# Altium PCB 0060631C.PcbDoc (part 6 of 7)
Units mil, origin at the board's own origin, x right, y up, seen from the top; angles counter-clockwise.
Board outline 5480 x 8249 mil, 6 copper layers (Top Layer, Mid-Layer 1, Mid-Layer 2, Internal Plane 1, Internal Plane 2, Bottom Layer); 514 components, 269 nets, 1375 pads, 1334 vias.
Unrouted connection lines stored in the file: 126.
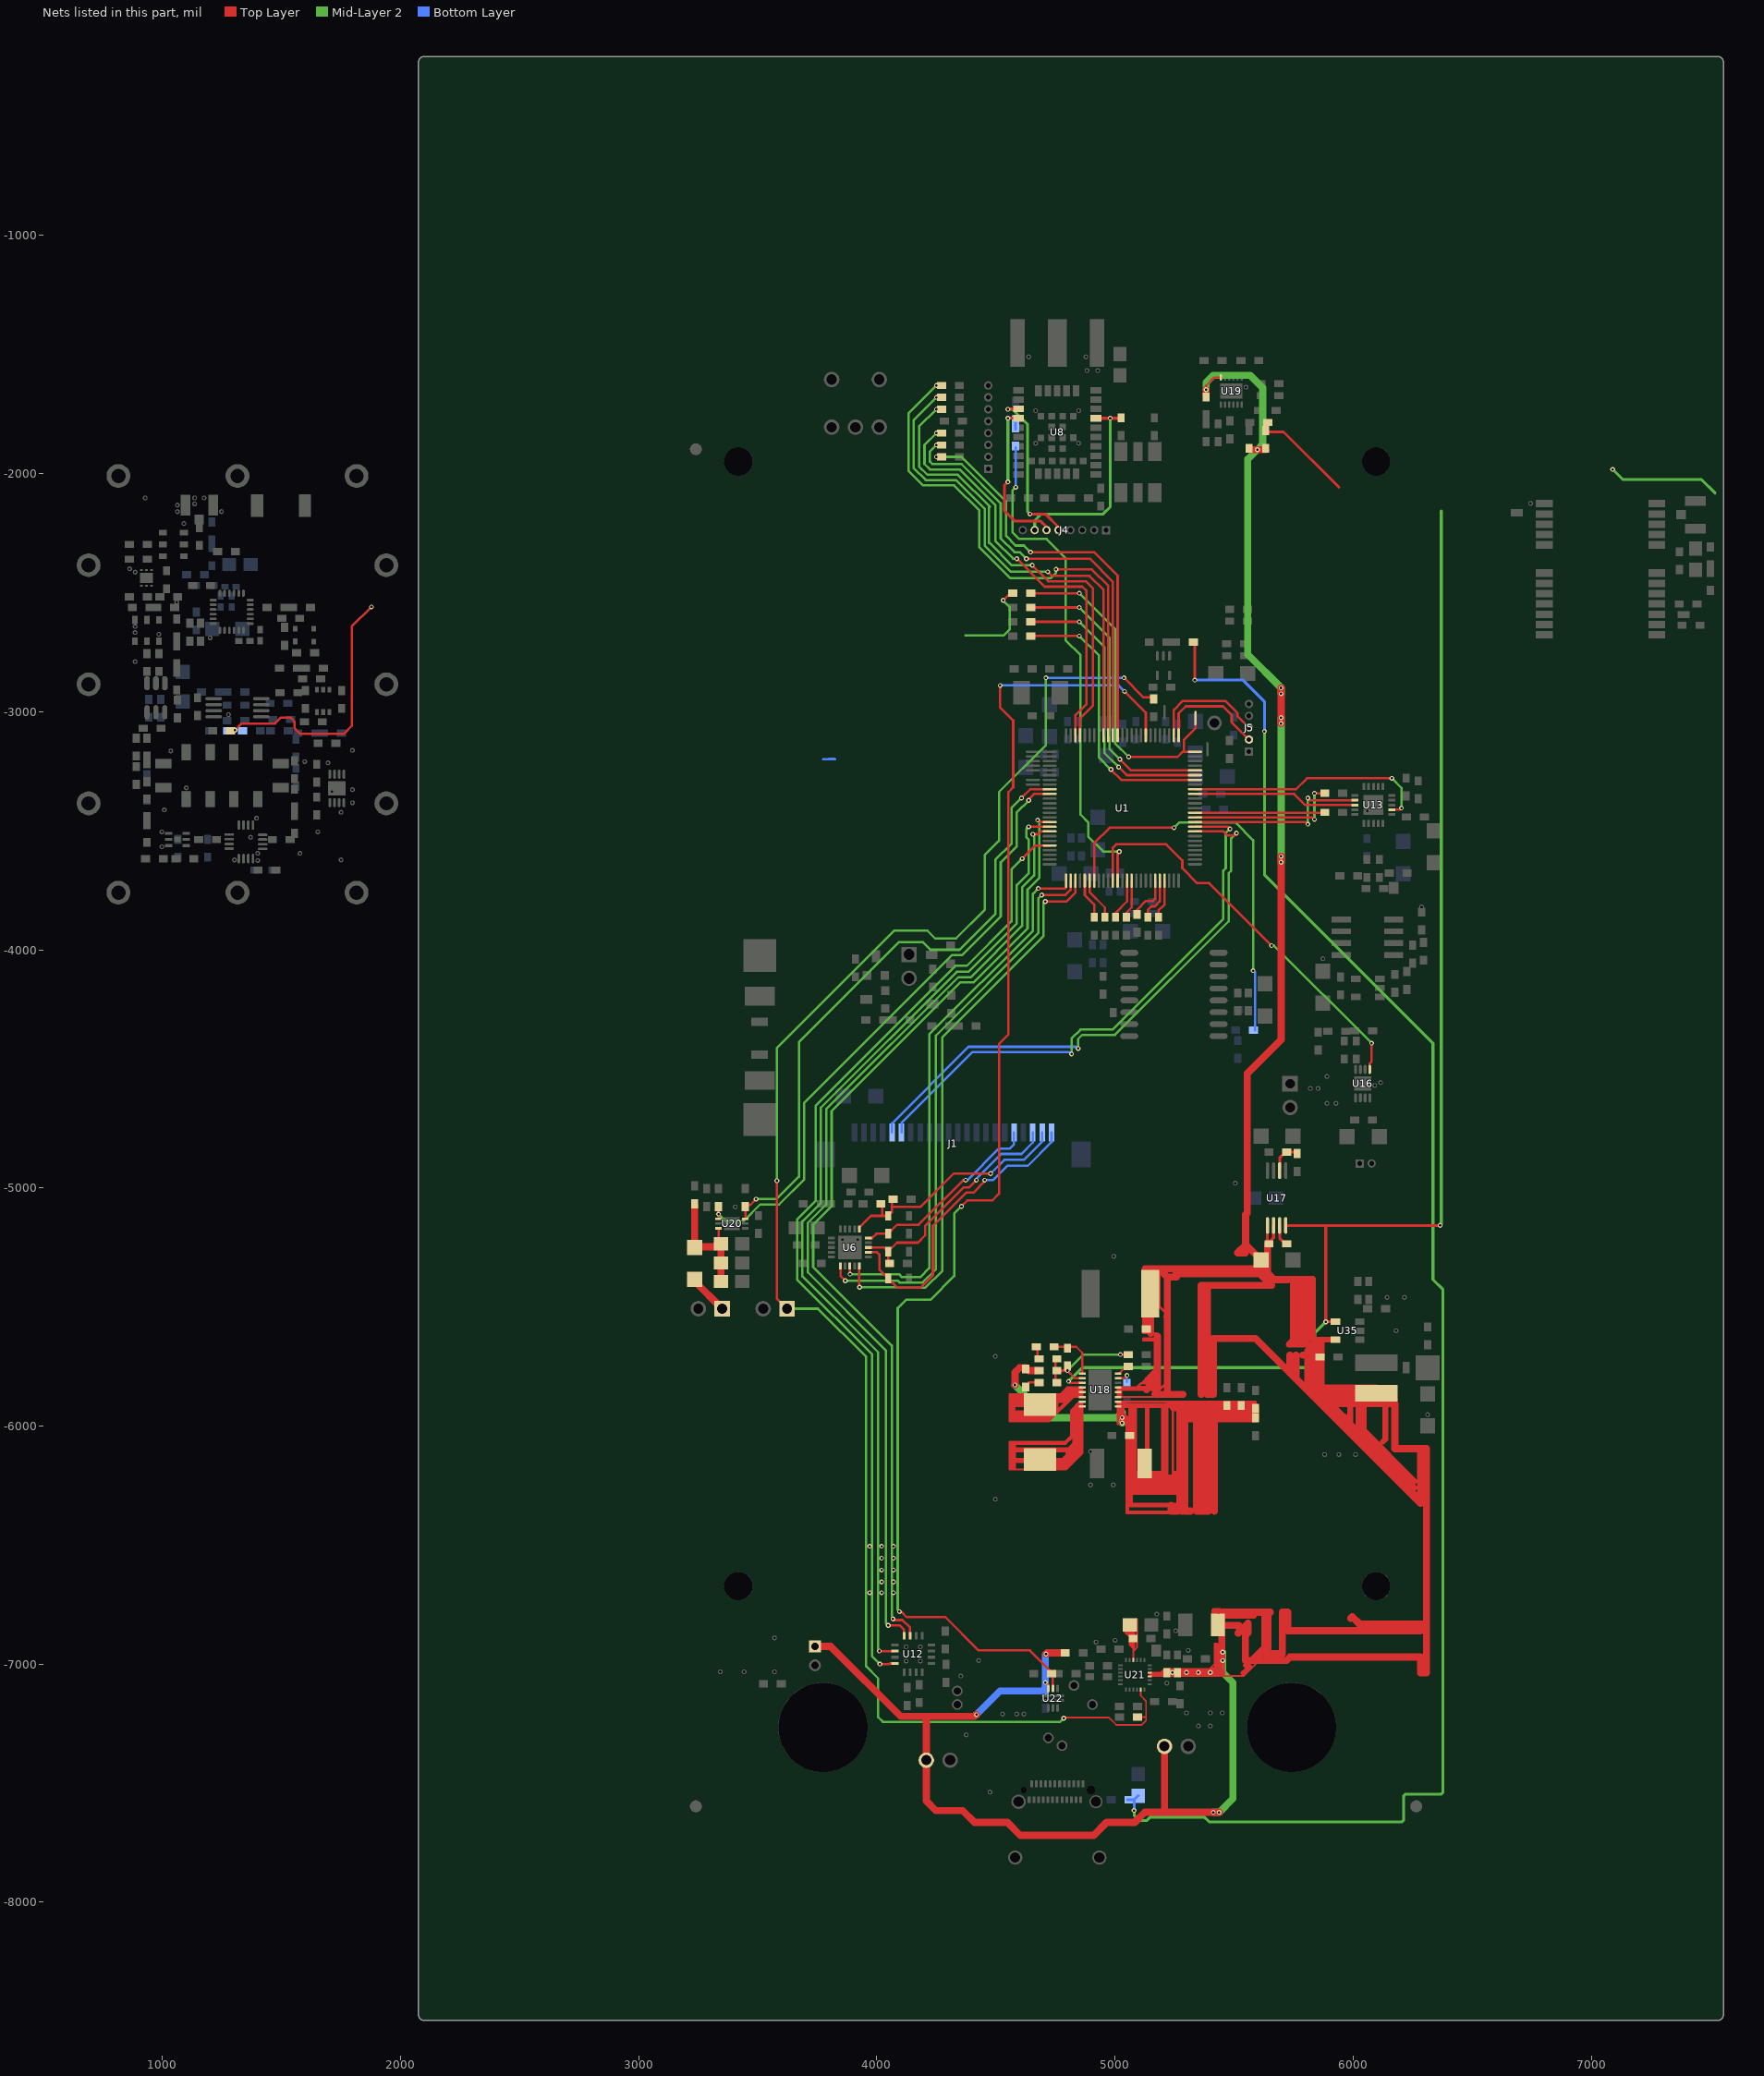
[diagram p10: the nets of this part, all layers, seen from the top]

## Via types
v1: diameter 20, hole 10, Top Layer to Bottom Layer, 1334 vias

## Nets (pads, with @x,y where several pads share a name; then routed paths per layer and width w, separated by ;. In a path a pad name is that pad's centre, name@x,y a point inside that pad or via, vN(x,y) a via of type N, cw(c..) or ccw(c..) an arc to the next point about the centre after c; other vN are vias at no path point) (continued)
N00220: L2.1 U18.12 U18.13 U18.14 | length 2929.3
  Top Layer w9: L2.1@4684.9,-5910 L2.1@4682.4,-5907.5 ; U18.13@4857.4,-5860.8 4857.4,-5852.5 ; 4562.4,-5980 4562.4,-5972.5 ; 4562.4,-5980 4722.4,-5980 4824.9,-5877.5 4862.4,-5877.5 U18.14@4862.4,-5878.1 4862.4,-5870 ; 4562.4,-5980 4557.4,-5980 4557.4,-5867.5 4562.4,-5867.5 ; 4562.4,-5972.5 4562.4,-5882.5 ; 4562.4,-5972.5 4714.9,-5972.5 4719.9,-5972.5 4822.4,-5870 4862.4,-5870 ; 4562.4,-5882.5 4562.4,-5875 ; 4562.4,-5882.5 L2.1@4682.4,-5882.5 ; 4562.4,-5875 4562.4,-5867.5 ; 4562.4,-5875 L2.1@4682.4,-5875 ; 4562.4,-5867.5 L2.1@4682.4,-5867.5 ; L2.1@4682.4,-5907.5 L2.1@4682.4,-5892.5 ; L2.1@4682.4,-5907.5 L2.1@4682.4,-5892.5 ; L2.1@4682.4,-5892.5 L2.1@4682.4,-5882.5 ; L2.1@4682.4,-5882.5 4774.9,-5882.5 4804.9,-5852.5 4857.4,-5852.5 ; L2.1@4682.4,-5882.5 L2.1@4682.4,-5875 ; L2.1@4682.4,-5875 4772.4,-5875 4802.4,-5845 4857.4,-5845 ; L2.1@4682.4,-5875 L2.1@4682.4,-5867.5 ; L2.1@4682.4,-5867.5 4769.9,-5867.5 4798.6,-5838.8 U18.12@4862.4,-5838.8 4862.4,-5845 ; 4857.4,-5852.5 4857.4,-5845 ; 4857.4,-5852.5 4862.4,-5852.5 ; 4857.4,-5845 4862.4,-5845 ; 4862.4,-5870 U18.13@4862.4,-5858.4 4862.4,-5852.5 ; 4862.4,-5852.5 4862.4,-5845
  Top Layer w20: 4572.4,-5927.5 4572.4,-5910 ; 4714.9,-5972.5 4757.4,-5930 4752.4,-5925 ; U18.13@4857.4,-5860.8 4814.1,-5860.8 4782.4,-5892.5 4752.4,-5892.5 ; 4572.4,-5910 4572.4,-5892.5 L2.1@4682.4,-5892.5 ; 4572.4,-5910 L2.1@4684.9,-5910 4649.9,-5945 4572.4,-5945 4572.4,-5962.5 4707.4,-5962.5 4748.6,-5921.3 4752.4,-5925 ; L2.1@4682.4,-5892.5 4752.4,-5892.5 ; L2.1@4682.4,-5892.5 4752.4,-5892.5 ; 4752.4,-5925 4752.4,-5892.5
N00221: L2.2 U18.15 U18.16 | length 3813.1
  Top Layer w9: 4575,-6075.1 4574.9,-6075 4792.4,-6075 ; 4564.9,-6182.5 4564.9,-6175 ; 4564.9,-6182.5 4557.4,-6182.5 4557.4,-6067.5 4564.9,-6067.5 ; 4564.9,-6182.5 L2.2@4674.9,-6182.5 ; 4564.9,-6175 4575,-6175 4564.9,-6175 ; 4564.9,-6175 4564.9,-6075 ; 4564.9,-6075 4564.9,-6067.5 ; 4564.9,-6075 4575,-6075 4792.4,-6075 ; 4564.9,-6067.5 4789.9,-6067.5 4814.9,-6042.5 4814.9,-5935 4852.1,-5897.8 U18.15@4862.4,-5897.8 4862.4,-5905 ; L2.2@4674.9,-6182.5 4794.9,-6182.5 4862.4,-6115 U18.16@4862.4,-5917.5 4862.4,-5905 ; L2.2@4674.9,-6182.5 L2.2@4674.9,-6175 ; L2.2@4674.9,-6175 4792.4,-6175 4854.9,-6112.5 4854.9,-5907.5 4857.4,-5905 ; L2.2@4674.9,-6175 4674.9,-6162.5 4674.9,-6150 L2.2@4679.9,-6145 ; L2.2@4679.9,-6145 L2.2@4684.9,-6140 L2.2@4679.9,-6145 ; 4792.4,-6075 4822.4,-6045 4822.4,-5935 4852.4,-5905 4857.4,-5905 ; 4857.4,-5905 4862.4,-5905
  Top Layer w20: 4575,-6075.1 4575,-6100 ; L2.2@4674.9,-6162.5 4787.4,-6162.5 4842.4,-6107.5 4842.4,-6062.5 ; 4802.4,-6112.5 4812.4,-6112.5 ; 4575,-6145 4575,-6175 4575,-6145 ; 4575,-6145 L2.2@4679.9,-6145 ; 4575,-6145 4575,-6100 ; 4575,-6145 L2.2@4679.9,-6145 ; 4575,-6100 4804.9,-6100 4842.4,-6062.5 ; L2.2@4679.9,-6145 4779.9,-6145 ; L2.2@4679.9,-6145 4779.9,-6145 ; 4779.9,-6145 4812.4,-6112.5 ; 4812.4,-6112.5 4829.9,-6095 4829.9,-5935 4842.4,-5922.5 4842.4,-6062.5
N00222: C59.1 C131.1 R67.2 R69.1 R70.1 R71.1 R72.1 R73.1 U18.1 U18.2 | length 14054.4
  Top Layer w9: v1(5029.9,-5987.5) 5024.9,-5992.5 5012.4,-5992.5 5012.4,-5957.5 ; 5034.9,-5905 5019.9,-5905 ; 5064.9,-6207.5 5127.4,-6207.5 C59.1@5127.4,-6197.5 ; C59.1@5132.4,-6157.5 C59.1@5127.4,-6162.5 ; 5155.2,-6207.5 5212.4,-6207.5 ; 5219.6,-6137.8 5219.6,-6207.5 ; 5242.4,-5927.5 5242.4,-6205 5239.9,-6207.5 ; 5242.4,-5915 5242.4,-5905 ; 5269.6,-5902.5 5269.6,-5897.8 ; 5590,-5902.5 5590,-5897.8 5269.6,-5897.8 ; 5012.4,-5957.5 5029.9,-5975 ; 5012.4,-5957.5 5029.9,-5975 ; 5012.4,-5957.5 5012.4,-5925 ; 5012.4,-5925 U18.1@5019.9,-5917.5 ; 5012.4,-5925 U18.1@5012.4,-5917.5 U18.2@5012.4,-5897.8 U18.2@5019.9,-5897.8 ; U18.1@5019.9,-5917.5 5019.9,-5905 ; U18.1@5019.9,-5917.5 5019.9,-5955 v1(5029.9,-5965) 5031.1,-5966.2 5054.9,-5990 C131.1@5054.9,-6052.5 ; 5019.9,-5905 U18.2@5019.9,-5897.8 ; U18.2@5019.9,-5897.8 5219.6,-5897.8 ; 5029.9,-5975 5047.7,-5992.8 5047.7,-6059.7 ; 5047.7,-6214.7 5047.7,-6367.2 5269.6,-6367.2 5269.6,-6214.7 ; 5047.7,-6214.7 5047.7,-6059.7 ; 5047.7,-6214.7 5064.9,-6214.7 C59.1@5127.4,-6214.7 ; 5047.7,-6059.7 C131.1@5054.9,-6052.5 ; C131.1@5054.9,-6052.5 5054.9,-6360 5262.4,-6360 5262.4,-6357.5 ; C131.1@5054.9,-6052.5 C131.1@5064.9,-6042.5 ; C131.1@5064.9,-6042.5 5067.4,-6040 C131.1@5064.9,-6042.5 ; C59.1@5127.4,-6214.7 5219.6,-6214.7 ; C59.1@5127.4,-6214.7 C59.1@5127.4,-6197.5 ; C59.1@5127.4,-6197.5 C59.1@5127.4,-6162.5 ; C59.1@5127.4,-6197.5 C59.1@5127.4,-6162.5 ; 5212.4,-6207.5 5219.6,-6207.5 ; 5212.4,-6207.5 5212.4,-6145 ; 5212.4,-6145 5212.4,-5915 5212.4,-6145 ; 5219.6,-6214.7 5252.4,-6214.7 ; 5219.6,-6214.7 5219.6,-6207.5 ; 5219.6,-6207.5 5239.9,-6207.5 ; 5219.6,-5915 5219.6,-5905 ; 5219.6,-5915 5219.6,-6133 5219.6,-5915 ; 5219.6,-5915 5219.6,-5905 ; 5219.6,-5905 5242.4,-5905 ; 5219.6,-5905 5219.6,-5897.8 ; 5219.6,-5897.8 5269.6,-5897.8 ; 5239.9,-6207.5 5252.4,-6207.5 ; 5242.4,-5905 5262.4,-5905 5262.4,-5920 ; 5252.4,-6214.7 5262.4,-6214.7 ; 5252.4,-6214.7 5262.4,-6214.7 ; 5252.4,-6207.5 5262.4,-6207.5 ; 5252.4,-6207.5 5262.4,-6207.5 ; 5262.4,-6357.5 5262.4,-6214.7 ; 5262.4,-6357.5 5262.4,-6214.7 ; 5262.4,-6214.7 5269.6,-6214.7 ; 5262.4,-6207.5 5262.4,-5920 ; 5262.4,-6207.5 5262.4,-5920 ; 5269.6,-6214.7 5269.6,-5920 5269.6,-6214.7
  Top Layer w10: 5212.4,-6145 5219.6,-6137.8 5219.6,-6133 ; 5269.6,-5920 5269.6,-5902.5 ; 5269.6,-5902.5 5590,-5902.5 ; 5269.6,-5902.5 5590,-5902.5 ; 5590,-5902.5 5590,-5920 5590,-5902.5
  Top Layer w20: v1(5029.9,-5987.5) 5029.9,-5975 5029.9,-5967.4 v1@5031.1,-5966.2 ; C59.1@5129.9,-6155 C59.1@5134.9,-6155 ; C59.1@5132.4,-6157.5 C59.1@5134.9,-6155 ; 5155.2,-6207.5 5152.4,-6204.7 C59.1@5152.4,-6197.5 ; 5242.4,-5927.5 5252.4,-5927.5 5252.4,-5920 5252.4,-5915 5242.4,-5915 5219.6,-5915 5212.4,-5915 ; 5252.4,-6332.5 5235,-6332.5 5064.9,-6332.5 5064.9,-6280 ; 5252.4,-6207.5 5252.4,-6197.5 ; 5064.9,-6280 5252.4,-6280 5252.4,-6262.5 ; 5064.9,-6280 5064.9,-6262.5 ; 5064.9,-6262.5 5064.9,-6245 ; 5064.9,-6262.5 5252.4,-6262.5 ; 5064.9,-6245 5252.4,-6245 ; 5064.9,-6245 5064.9,-6227.5 ; 5064.9,-6227.5 5064.9,-6214.7 5064.9,-6207.5 ; 5064.9,-6227.5 5252.4,-6227.5 ; 5064.9,-6207.5 5064.9,-6197.5 ; 5064.9,-6207.5 5064.9,-6197.5 ; 5064.9,-6197.5 C131.1@5064.9,-6042.5 ; 5064.9,-6197.5 C131.1@5064.9,-6042.5 ; 5064.9,-6197.5 5082.4,-6197.5 ; C131.1@5064.9,-6042.5 5064.9,-5985 ; 5064.9,-5985 5029.9,-5950 5029.9,-5910 5034.9,-5905 5044.9,-5915 5064.9,-5915 ; 5064.9,-5985 5064.9,-5915 ; 5064.9,-5915 5082.4,-5915 ; 5082.4,-6197.5 5082.4,-5915 ; 5082.4,-6197.5 C59.1@5097.4,-6197.5 ; 5082.4,-5915 5134.9,-5915 ; C59.1@5097.4,-6197.5 C59.1@5099.9,-6197.5 ; C59.1@5097.4,-6197.5 5099.9,-6195 C59.1@5099.9,-6197.5 ; C59.1@5099.9,-6197.5 C59.1@5127.4,-6197.5 ; C59.1@5099.9,-6197.5 C59.1@5127.4,-6197.5 ; C59.1@5127.4,-6197.5 C59.1@5152.4,-6197.5 ; C59.1@5134.9,-6155 5134.9,-5915 ; 5134.9,-5915 5202.4,-5915 ; C59.1@5152.4,-6197.5 5202.4,-6197.5 5202.4,-5915 ; 5202.4,-5915 5212.4,-5915 ; 5202.4,-5915 5212.4,-5915 ; 5252.4,-6262.5 5252.4,-6245 ; 5252.4,-6245 5252.4,-6227.5 ; 5252.4,-6227.5 5252.4,-6214.7 5252.4,-6227.5
  Top Layer w30: v1(4579.9,-5827.5) 4579.9,-5775 4599.9,-5755 4624.9,-5755 4637.4,-5767.5 R69.1@4674.9,-5767.5 ; 5242.4,-5915 5242.4,-5920 5252.4,-5920 5262.4,-5920 ; 5280,-6357.5 5280,-5970 ; 5317.5,-6357.5 5292.5,-6357.5 5292.5,-5977.5 5280,-5970 ; 5417.5,-6357.5 5417.5,-5970 ; 5235,-6357.5 5235,-6332.5 5235,-6357.5 ; 5235,-6357.5 5262.4,-6357.5 5235,-6357.5 ; 5262.4,-5920 5269.6,-5920 ; 5262.4,-5920 5269.6,-5920 ; 5269.6,-5920 R71.1@5470,-5920 ; 5269.6,-5920 R71.1@5470,-5920 ; 5269.6,-5920 R71.1@5470,-5920 ; 5280,-5970 5280,-5940 5470,-5940 ; 5280,-5970 5342.5,-5970 ; 5342.5,-5970 5342.5,-6357.5 5367.5,-6357.5 ; 5342.5,-5970 5367.5,-5970 ; 5367.5,-6357.5 5392.5,-6357.5 5392.5,-5970 ; 5367.5,-6357.5 5367.5,-5970 ; 5367.5,-5970 5392.5,-5970 ; 5392.5,-5970 5417.5,-5970 ; 5417.5,-5970 5590,-5970 5590,-5960 R67.2@5590,-5940 ; 5470,-5940 R67.2@5590,-5940 ; 5470,-5940 R71.1@5470,-5920 ; R71.1@5470,-5920 5530,-5920 5590,-5920 R67.2@5590,-5940
  Mid-Layer 2 w30: v1(4579.9,-5827.5) 4717.4,-5965 5007.4,-5965 ; v1(5029.9,-5987.5) 5007.4,-5965 ; v1(5029.9,-5965) 5029.9,-5942.5 5007.4,-5965
N00223: C58.2 C60.2 C61.2 R64.1 R69.2 U18.10 | length 578.8
  Top Layer w9: v1(4799.9,-5767.5) 4831.8,-5799.4 U18.10@4862.4,-5799.4
  Top Layer w10: C58.2@4749.9,-5817.5 R69.2@4749.9,-5767.5 ; C60.2@4749.9,-5717.5 R69.2@4749.9,-5767.5 ; C61.2@4799.9,-5742.5 v1(4799.9,-5767.5) ; v1(5022.5,-5700) R64.1@5050,-5700 ; R69.2@4749.9,-5767.5 v1(4799.9,-5767.5) ; R69.2@4749.9,-5767.5 v1(4799.9,-5767.5)
  Mid-Layer 2 w10: v1(4799.9,-5767.5) 4867.4,-5700 v1(5022.5,-5700)
N00224: C58.1 R70.2 | length 55.2
  Top Layer w9: R70.2@4624.9,-5830 4637.4,-5817.5 C58.1@4674.9,-5817.5
N00225: R68.1 U18.7 | length 69.9
  Top Layer w9: U18.7@5012.4,-5799.4 5038,-5799.4 v1(5049.9,-5787.5)
  Bottom Layer w9: R68.1@5049.9,-5815 v1(5049.9,-5787.5)
N00226: R65.1 U18.8 | length 51.2
  Top Layer w9: U18.8@5012.4,-5779.7 5020,-5779.7 5020,-5777.5 5047.5,-5750 R65.1@5050,-5750
N00227: C61.1 R66.1 U18.9 | length 210.1
  Top Layer w9: R66.1@4749.9,-5667.5 4799.9,-5667.5 4837.4,-5667.5 4862.4,-5692.5 U18.9@4862.4,-5779.7
N00228: C60.1 R66.2 | length 50
  Top Layer w9: C60.1@4674.9,-5717.5 R66.2@4674.9,-5667.5
N00229: R61.2 R62.1 U17.6 | length 137.4
  Top Layer w12: U17.6@5691.2,-4927.5 5691.2,-4873.8 5715,-4850 R62.1@5765,-4850
N00230: C65.1 F1.2 R92.1 R93.2 R94.2 U20.6 | length 523.3
  Top Layer w10: R94.2@3327.5,-5235 3335.1,-5227.4 U20.6@3335.1,-5170
  Top Layer w30: F1.2@3235,-5250 F1.2@3235,-5247.5 ; R92.1@3235,-5072.5 F1.2@3235,-5247.5 ; R94.2@3327.5,-5235 R94.2@3332.5,-5235 ; C65.1@3345,-5392.5 R93.2@3345,-5315 R94.2@3345,-5235 R94.2@3332.5,-5235 ; F1.2@3235,-5247.5 3320,-5247.5 R94.2@3332.5,-5235
N00231: R60.2 U17.3 | length 87.4
  Top Layer w12: U17.3@5691.2,-5157.5 5691.2,-5211.2 R60.2@5715,-5235
N00232: F1.1 J8.1 | length 170.1
  Top Layer w30: F1.1@3235,-5385 3235,-5392.5 J8.1@3350,-5507.5
NINA_CTS_1: R19.2 U1.48 | length 1793
  Top Layer w10: v1(4587.5,-2357.5) 4705,-2475 4862.5,-2475 4880,-2492.5 4880,-2967.5 4833.6,-3013.9 U1.48@4833.6,-3099.6
  Top Layer w12: v1(4250,-1830) R19.2@4277.5,-1830
  Mid-Layer 2 w10: v1(4250,-1830) 4200,-1880 4200,-1960 4222.5,-1982.5 4347.5,-1982.5 4497.5,-2132.5 4497.5,-2282.5 4572.5,-2357.5 v1(4587.5,-2357.5)
NINA_DSR_1: R16.2 U1.42 | length 2074.2
  Top Layer w10: v1(4717.5,-2412.5) 4735,-2430 4892.5,-2430 4951.8,-2489.3 U1.42@4951.8,-3099.6
  Top Layer w12: v1(4250,-1680) R16.2@4277.5,-1680
  Mid-Layer 2 w10: v1(4250,-1680) 4155,-1775 4155,-1977.5 4205,-2027.5 4332.5,-2027.5 4452.5,-2147.5 4452.5,-2302.5 4562.5,-2412.5 v1(4717.5,-2412.5)
NINA_DTR_1: R17.2 U1.41 | length 2231.9
  Top Layer w10: v1(4752.5,-2402.5) 4902.5,-2402.5 4971.5,-2471.5 U1.41@4971.5,-3099.6
  Top Layer w12: v1(4250,-1630) R17.2@4277.5,-1630
  Mid-Layer 2 w10: v1(4250,-1630) 4132.5,-1747.5 4132.5,-1987.5 4195,-2050 4325,-2050 4430,-2155 4430,-2310 4560,-2440 4730,-2440 4752.5,-2417.5 v1(4752.5,-2402.5)
NINA_RST_1: R29.2 U1.87 | length 2120.9
  Top Layer w10: U1.87@5010.9,-3709.6 5010.9,-3594.1 v1(5017.5,-3587.5)
  Mid-Layer 2 w10: v1@4582.5,-2057 v1(4583,-2057.5) 4570,-2070.5 4570,-2247.5 4597.5,-2275 4712.5,-2275 4792.5,-2355 4792.5,-2700 4855,-2762.5 4855,-3432.5 4887.5,-3465 4887.5,-3525 4950,-3587.5 v1(5017.5,-3587.5)
  Bottom Layer w10: R29.2@4582.5,-1890 4582.5,-2057 v1(4583,-2057.5)
NINA_RTS_1: R28.2 U1.47 | length 1968.7
  Top Layer w10: v1(4652.5,-2385) 4720,-2452.5 4877.5,-2452.5 4907.5,-2482.5 4907.5,-2973.3 4853.3,-3027.5 U1.47@4853.3,-3099.6
  Top Layer w12: v1(4250,-1730) R28.2@4277.5,-1730
  Mid-Layer 2 w10: v1(4250,-1730) 4177.5,-1802.5 4177.5,-1970 4212.5,-2005 4340,-2005 4475,-2140 ; 4470,-2292.5 4470,-2140 ; 4475,-2292.5 4567.5,-2385 v1(4652.5,-2385)
NINA_RX_1: R15.2 U1.39 | length 1751
  Top Layer w10: v1(4645,-2330) 4912.5,-2330 5010.9,-2428.4 U1.39@5010.9,-3099.6
  Top Layer w12: v1(4250,-1930) R15.2@4277.5,-1930
  Mid-Layer 2 w10: v1(4250,-1930) 4355,-1930 4542.5,-2117.5 4542.5,-2262.5 4582.5,-2302.5 4617.5,-2302.5 v1(4645,-2330)
NINA_TX_1: R18.2 U1.40 | length 1817.8
  Top Layer w10: v1(4627.5,-2357.5) 4893.7,-2357.5 4991.2,-2455 U1.40@4991.2,-3099.6
  Top Layer w12: v1(4250,-1880) R18.2@4277.5,-1880
  Mid-Layer 2 w10: v1(4250,-1880) 4222.5,-1907.5 4222.5,-1950 4232.5,-1960 4355,-1960 4520,-2125 4520,-2272.5 4577.5,-2330 4600,-2330 v1(4627.5,-2357.5)
ON/OFF_2: R96.2 R97.2 U17.4 U18.11 U35.4 | length 6320.4
  Top Layer w9: v1(4804.9,-5812.5) 4811.5,-5819.1 U18.11@4862.4,-5819.1
  Top Layer w12: R96.2@5635,-1785 5632.5,-1787.5 5632.5,-1825 5707.5,-1825 5940,-2057.5 ; U17.4@5716.8,-5157.5 5885,-5157.5 ; U35.4@5925.5,-5562.5 v1(5885,-5562.5) 5885,-5157.5 ; v1(6365,-5157.5) 5885,-5157.5
  Mid-Layer 2 w12: v1(4804.9,-5812.5) 4862.4,-5755 5802.5,-5755 5840,-5717.5 5840,-5607.5 v1(5885,-5562.5) ; v1(6365,-5157.5) 6370,-5152.5 6370,-2157.5 ; v1(7090,-1982.5) 7132.5,-2025 7462.5,-2025 7520,-2082.5
PC_CTS_1: U1.71 U12.4 | length 4148.7
  Top Layer w10: v1(4012.5,-7000) 4052.5,-7000 4055.6,-6996.9 U12.4@4075.7,-6996.9 ; v1(4610,-3617.5) 4665.3,-3562.2 U1.71@4725.6,-3562.2
  Mid-Layer 2 w10: v1(4012.5,-7000) 3980,-6967.5 3980,-5700 3665,-5385 3665,-5132.5 3742.5,-5055 3742.5,-4655 4330,-4067.5 4377.5,-4067.5 4565,-3880 4565,-3662.5 v1(4610,-3617.5)
  other v1: 3970,-6700 3970,-6505
PC_RTS_1: U1.68 U12.16 | length 4064.7
  Top Layer w10: v1(4047.5,-6837.5) 4096.3,-6837.5 4113.8,-6855 U12.16@4113.8,-6882 ; v1(4655,-3515) 4677.5,-3515 4689.4,-3503.1 U1.68@4725.6,-3503.1
  Mid-Layer 2 w10: v1(4047.5,-6837.5) 4037.5,-6827.5 4037.5,-5682.5 3710,-5355 3710,-5147.5 3787.5,-5070 3787.5,-4670 4342.5,-4115 4395,-4115 4610,-3900 4610,-3737.5 4660,-3687.5 4660,-3520 v1(4655,-3515)
PC_RX_1: U1.67 U12.2 | length 4188.4
  Top Layer w10: v1(4010,-6945) 4010.7,-6945.7 U12.2@4075.7,-6945.7 ; v1(4637.5,-3483.4) U1.67@4725.6,-3483.4
  Mid-Layer 2 w10: v1(4010,-6945) v1@4005,-6940 ; v1@4010.7,-6945.7 v1@4005,-6940 ; v1(4637.5,-3483.4) 4627.5,-3493.4 4627.5,-3527.5 4637.5,-3537.5 4637.5,-3677.5 4587.5,-3727.5 4587.5,-3890 4385,-4092.5 4335,-4092.5 3765,-4662.5 3765,-5062.5 3687.5,-5140 3687.5,-5372.5 4005,-5690 v1@4005,-6940
  other v1: 4020,-6700 4020,-6655 4020,-6605 4020,-6555 4020,-6505
PC_TX_1: U1.66 U12.15 | length 4109.1
  Top Layer w10: U12.15@4139.4,-6882 4139.4,-6846.9 4107.5,-6815 v1@4072.5,-6815 ; v1(4675,-3455) 4683.7,-3463.7 U1.66@4725.6,-3463.7 ; v1@4072.5,-6815 4072.5,-6810 v1(4067.5,-6810) v1@4072.5,-6815
  Mid-Layer 2 w10: v1(4067.5,-6810) 4062.5,-6805 4062.5,-5662.5 3732.5,-5332.5 3732.5,-5155 3810,-5077.5 3810,-4677.5 4350,-4137.5 4405,-4137.5 4632.5,-3910 4632.5,-3747.5 4682.5,-3697.5 4682.5,-3462.5 v1(4675,-3455)
  other v1: 4070,-6700 4070,-6655 4070,-6605 4070,-6555 4070,-6505
PGEC2_1: J5.2 U1.26 | length 475.6
  Top Layer w10: U1.26@5267,-3099.6 5267,-3007.5 5297,-2977.5 5452.5,-2977.5 5490,-3015 5490,-3045 J5.2@5562.5,-3117.5
PGED2_1: J5.3 U1.27 | length 491.6
  Top Layer w10: U1.27@5247.3,-3099.6 5247.3,-2992.7 5285,-2955 5462.5,-2955 5515,-3007.5 5515,-3020 J5.3@5562.5,-3067.5
RD_1: J1.17 U1.9 | length 2330.8
  Top Layer w10: U1.9@5335.6,-3483.4 5473.4,-3483.4 v1(5482.5,-3492.5)
  Mid-Layer 2 w10: v1(4817.5,-4437.5) 4817.5,-4372.5 4855,-4335 4990,-4335 5455,-3870 5455,-3667.5 5465,-3657.5 5465,-3510 v1(5482.5,-3492.5)
  Bottom Layer w10: J1.17@4103.1,-4767 4103.1,-4726.9 4400,-4430 4810,-4430 v1(4817.5,-4437.5)
RDYA_1: U1.17 U13.12 | length 1030.4
  Top Layer w10: U1.17@5335.6,-3325.8 5760,-3325.8 5805.8,-3280 v1(6162.5,-3280) ; U13.12@6162.3,-3411.6 6195.9,-3411.6 v1(6202.5,-3405)
  Mid-Layer 2 w10: v1(6162.5,-3280) 6202.5,-3320 v1(6202.5,-3405)
RF_CLK_1: R119.2 U1.20 | length 1223.1
  Top Layer w10: R119.2@4640,-2622.5 v1(4850,-2622.5) ; v1(5015,-3232.5) 5049.2,-3266.7 U1.20@5335.6,-3266.7
  Mid-Layer 2 w10: v1(4850,-2622.5) 4955,-2727.5 4955,-3172.5 v1(5015,-3232.5)
RF_DATA_1: R120.2 U1.19 | length 1196.2
  Top Layer w10: R120.2@4640,-2682.5 v1(4850,-2682.5) ; v1(4982.5,-3242.5) 5026.4,-3286.4 U1.19@5335.6,-3286.4
  Mid-Layer 2 w10: v1(4850,-2682.5) 4932.5,-2765 4932.5,-3192.5 v1(4982.5,-3242.5)
RF_LE_1: R121.2 U1.21 | length 1253
  Top Layer w10: R121.2@4640,-2562.5 v1(4850,-2562.5) ; v1(5020,-3200) 5067,-3247 U1.21@5335.6,-3247
  Mid-Layer 2 w10: v1(4850,-2562.5) 4977.5,-2690 4977.5,-3157.5 v1(5020,-3200)
RF_RSSI_1: R122.2 TP17.1 U1.25 | length 1431
  Top Layer w10: R122.2@4640,-2502.5 v1(4850,-2502.5) ; v1(5057.5,-3190) 5262.5,-3190 5284.3,-3168.2 5290,-3168.2 ; U1.25@5335.6,-3168.2 5290,-3168.2 ; TP17.1@5337.5,-3027.5 5337.5,-3070 5290,-3117.5 5290,-3168.2
  Mid-Layer 2 w10: v1(4850,-2502.5) 5000,-2652.5 5000,-3132.5 v1(5057.5,-3190)
ROM_CS0_1: R33.1 U1.81 | length 174.7
  Top Layer w10: U1.81@4892.7,-3709.6 4892.7,-3757.7 4957.5,-3822.5 R33.1@4957.5,-3857.5
ROM_CS1_1: R125.1 U1.82 | length 1692.6
  Top Layer w10: U1.82@4912.4,-3709.6 4912.4,-3552.6 4977.5,-3487.5 v1(5247.5,-3487.5)
  Mid-Layer 2 w10: v1(5247.5,-3487.5) 5270,-3465 5505,-3465 5580,-3540 v1(5580,-4087.5)
  Bottom Layer w10: v1(5580,-4087.5) 5587.5,-4095 R125.1@5587.5,-4337.5
ROM_D0_1: R35.1 U1.97 | length 158.4
  Top Layer w10: R35.1@5182.5,-3857.5 5182.5,-3835 5207.9,-3809.6 U1.97@5207.9,-3709.6
ROM_D1_1: R36.1 U1.96 | length 177.7
  Top Layer w10: R36.1@5137.5,-3857.5 5137.5,-3832.5 5152.5,-3817.5 5167.5,-3817.5 5188.2,-3796.8 U1.96@5188.2,-3709.6
ROM_D2_1: R37.1 U1.95 | length 196.1
  Top Layer w10: R37.1@5092.5,-3857.5 5092.5,-3832.5 5130,-3795 5158.5,-3795 5168.5,-3785 U1.95@5168.5,-3709.6
ROM_D3_1: R38.1 U1.90 | length 157.2
  Top Layer w10: R38.1@5047.5,-3857.5 5047.5,-3845 5070,-3822.5 U1.90@5070,-3709.6
ROM_RST_1: R39.1 U1.80 | length 164.3
  Top Layer w10: U1.80@4873,-3709.6 4873,-3770.5 4912.5,-3810 R39.1@4912.5,-3857.5
ROM_SCK_1: R34.1 U1.89 | length 167.7
  Top Layer w10: R34.1@5002.5,-3857.5 5002.5,-3845 5050.3,-3797.2 U1.89@5050.3,-3709.6
RSSI_3: C84.1 R102.2 R103.1 R122.1 | length 1582.2
  Top Layer w10: R102.2@1280,-3080 1302.5,-3080 v1(1305,-3077.5) 1332.5,-3050 1472.5,-3050 1497.5,-3025 1537.5,-3025 1555,-3042.5 1555,-3070 1577.5,-3092.5 1762.5,-3092.5 1795,-3060 1795,-2642.5 v1(1877.5,-2560) ; v1(4530,-2532.5) 4560,-2502.5 R122.1@4565,-2502.5
  Mid-Layer 2 w10: 4372.5,-2680 4532.5,-2680 4557.5,-2655 4557.5,-2560 v1(4530,-2532.5)
  Bottom Layer w10: 3775,-3200 3825,-3200 3822.5,-3197.5 3800,-3197.5
RST_1: J4.6 R29.1 R30.2 U8.19 | length 743.4
  Top Layer w12: v1(4550,-2035) 4535,-2050 4535,-2155 4580,-2200 4687.5,-2200 4712.5,-2225 J4.6@4712.5,-2237.5 ; v1(4550,-1767.5) 4594.1,-1767.5 U8.19@4594.5,-1767.9
  Mid-Layer 2 w12: v1(4550,-2035) v1(4550,-1767.5)
  Bottom Layer w12: v1(4550,-1767.5) R30.2@4582.5,-1767.5 ; R29.1@4582.5,-1815 R30.2@4582.5,-1770 ; R30.2@4582.5,-1770 R30.2@4582.5,-1767.5 ; R30.2@4582.5,-1770 4585,-1767.5 R30.2@4582.5,-1767.5
SCKA_1: U1.10 U13.2 | length 789.6
  Top Layer w10: U1.10@5335.6,-3463.7 5801.2,-3463.7 v1(5810,-3472.5) ; v1(5810,-3362.5) 5819.7,-3372.2 U13.2@6007.5,-3372.2
  Mid-Layer 2 w10: v1(5810,-3472.5) v1(5810,-3362.5)
SCKT_1: U1.76 U6.8 | length 2320
  Top Layer w10: U6.8@3886.4,-5327.8 3886.4,-5361.4 v1(3887.5,-5362.5) ; v1(4677.5,-3742.5) 4790,-3742.5 4794.2,-3738.3 U1.76@4794.2,-3709.6
  Mid-Layer 2 w10: v1(3887.5,-5362.5) 4092.5,-5362.5 4105,-5375 4182.5,-5375 4220,-5337.5 4220,-4355 4655,-3920 4655,-3765 v1(4677.5,-3742.5)
SCL_1: R85.2 U1.59 U20.3 | length 2638.7
  Top Layer w10: U20.3@3447.5,-5130.6 3447.5,-5072.5 3467.5,-5072.5 v1(3492.5,-5047.5) ; v1(4607.5,-3362.5) 4644.2,-3325.8 U1.59@4725.6,-3325.8
  Mid-Layer 2 w10: v1(3492.5,-5047.5) 3577.5,-5047.5 3672.5,-4952.5 3672.5,-4387.5 4092.5,-3967.5 4192.5,-3967.5 4225,-4000 4347.5,-4000 4497.5,-3850 4497.5,-3622.5 4565,-3555 4565,-3405 v1(4607.5,-3362.5)
SDA_1: R84.2 U1.60 U20.4 | length 2610.4
  Top Layer w10: R84.2@3335,-5072.5 v1(3335,-5110) 3335.1,-5110.1 U20.4@3335.1,-5130.6 ; v1(4637.5,-3372.5) 4637.5,-3367.5 4659.5,-3345.5 U1.60@4725.6,-3345.5
  Mid-Layer 2 w10: v1(3335,-5110) 3362.5,-5137.5 3442.5,-5137.5 3510,-5070 3589,-5070 3695,-4964 3695,-4642.5 4315,-4022.5 4357.5,-4022.5 4520,-3860 4520,-3632.5 4587.5,-3565 4587.5,-3422.5 v1(4637.5,-3372.5)
SDIA_1: R63.1 U1.12 | length 540.1
  Top Layer w10: U1.12@5335.6,-3424.3 5873.2,-3424.3 R63.1@5875,-3422.5
SDIT_1: U1.78 U6.10 | length 2389.5
  Top Layer w10: U6.10@3925.8,-5327.8 3925.8,-5415.8 v1(3927.5,-5417.5) ; v1(4707.5,-3797.5) 4795,-3797.5 4833.6,-3758.9 U1.78@4833.6,-3709.6
  Mid-Layer 2 w10: v1(3927.5,-5417.5) 4082.5,-5417.5 4085,-5420 4202.5,-5420 4275,-5347.5 4275,-4367.5 4700,-3942.5 4700,-3805 v1(4707.5,-3797.5)
SDOA_1: R59.1 U1.11 | length 652.9
  Top Layer w10: U1.11@5335.6,-3444 5829,-3444 v1(5837.5,-3452.5) ; v1(5837.5,-3342.5) R59.1@5875,-3342.5
  Mid-Layer 2 w10: v1(5837.5,-3452.5) v1(5837.5,-3342.5)
SDOT_1: U1.77 U6.6 | length 2402.7
  Top Layer w10: U6.6@3847,-5327.8 3847,-5369.5 v1(3867.5,-5390) ; v1(4692.5,-3770) 4792.5,-3770 4813.9,-3748.6 U1.77@4813.9,-3709.6
  Mid-Layer 2 w10: v1(3867.5,-5390) 4087.5,-5390 4095,-5397.5 4192.5,-5397.5 4247.5,-5342.5 4247.5,-4360 4677.5,-3930 4677.5,-3785 v1(4692.5,-3770)
SHUTDOWN_1: U1.86 U16.1 | length 1708.5
  Top Layer w10: U1.86@4991.2,-3709.6 4991.2,-3571.3 5005,-3557.5 5215,-3557.5 5282.5,-3625 5282.5,-3657.5 5345,-3720 5395,-3720 v1(5657.5,-3982.5) ; U16.1@6069.7,-4502.5 6069.7,-4477.8 6077.5,-4470 v1(6077.5,-4392.5)
  Mid-Layer 2 w10: v1(5657.5,-3982.5) 5667.5,-3982.5 v1(6077.5,-4392.5)
SSBA_1: U1.16 U13.3 | length 691.1
  Top Layer w10: U1.16@5335.6,-3345.5 5752.5,-3345.5 5798.9,-3391.9 U13.3@6007.5,-3391.9
SW1_1: J4.7 R12.1 U8.7 | length 1238.2
  Top Layer w12: U8.7@4919.5,-1767.9 v1@4979.6,-1767.9 ; v1@4979.6,-1765.4 v1@4979.6,-1767.9 ; R12.1@5025,-1760 5017.1,-1767.9 v1@4979.6,-1767.9
  Mid-Layer 2 w12: J4.7@4662.5,-2237.5 4662.5,-2197.5 4690,-2170 4950,-2170 4980,-2140 ; v1@4979.6,-1767.9 v1(4980,-1767.5) ; 4980,-2140 v1(4980,-1767.5) ; 4980,-2140 v1(4980,-1767.5)
SW2_1: J4.5 U8.18 | length 690.4
  Top Layer w12: v1(4550,-1730) 4551.5,-1728.5 U8.18@4594.5,-1728.5 ; v1(4642.5,-2170) 4707.5,-2170 4762.5,-2225 J4.5@4762.5,-2237.5
  Mid-Layer 2 w12: v1(4550,-1730) 4570,-1730 4632.5,-1792.5 4632.5,-2160 v1(4642.5,-2170)
THM_1: J9.1 R86.1 R123.1 U21.11 | length 7105.5
  Top Layer w7: R86.1@5100,-7222.7 5100.2,-7222.5 5130,-7222.5 ; U21.11@5108.1,-7106.6 5108.1,-7133.3 5130,-7155.2 5130,-7222.5 ; v1@4787.5,-7225 4785,-7225 v1(4785,-7227.5) v1@4787.5,-7225 ; v1@4787.5,-7225 4975,-7225 5005,-7255 5112.5,-7255 5130,-7237.5 5130,-7222.5
  Top Layer w10: v1(3580,-4970) 3580,-5465 J9.1@3622.5,-5507.5 ; v1(5037.5,-2857.5) 5120,-2940 R123.1@5162.5,-2940
  Mid-Layer 2 w10: v1(3580,-4970) 3580,-4412.5 4072.5,-3920 4212.5,-3920 4245,-3952.5 4332.5,-3952.5 4452.5,-3832.5 4452.5,-3602.5 4512.5,-3542.5 4512.5,-3337.5 4710,-3140 v1(4710,-2857.5) ; J9.1@3622.5,-5507.5 3752.5,-5507.5 3955,-5710 3955,-6605 3955,-6705 3955,-7010 4005,-7060 4005,-7222.5 4025,-7242.5 4770,-7242.5 v1(4785,-7227.5)
  Bottom Layer w10: v1(4710,-2857.5) v1(5037.5,-2857.5)
TP_5V: C66.1 C67.1 U21.22 | length 931.8
  Top Layer w7: U21.22@5076.6,-6982.6 5076.6,-6946.1 ; C67.1@5089.6,-6812.7 C67.1@5087.5,-6810.2 ; 5047.5,-6872.7 5053.8,-6879 ; 5047.5,-6872.7 C67.1@5047.5,-6850.2 ; 5047.5,-6872.7 5042.5,-6867.7 5042.5,-6855.2 C67.1@5047.5,-6850.2 ; C67.1@5047.5,-6850.2 C67.1@5060,-6837.7 ; 5053.8,-6879 C66.1@5060,-6885.2 ; 5053.8,-6879 5053.8,-6856.4 C67.1@5060,-6850.2 ; C66.1@5060,-6885.2 C67.1@5060,-6850.2 ; C66.1@5060,-6885.2 C66.1@5065,-6888.9 ; C67.1@5060,-6850.2 C67.1@5060,-6837.7 ; C67.1@5060,-6837.7 C67.1@5062.5,-6835.2 ; C67.1@5062.5,-6835.2 5065.2,-6832.9 5065,-6833.1 C67.1@5065,-6837.7 ; C67.1@5062.5,-6835.2 C67.1@5087.5,-6810.2 ; C67.1@5062.5,-6835.2 C67.1@5065,-6837.7 ; 5065,-6922.7 5060,-6917.7 5060,-6902.7 C66.1@5065,-6897.7 ; 5065,-6922.7 5071.3,-6929 ; 5065,-6922.7 C66.1@5065,-6897.7 ; C66.1@5065,-6897.7 5070,-6892.7 C66.1@5065,-6888.9 ; C66.1@5065,-6888.9 C67.1@5065,-6837.7 ; C67.1@5065,-6837.7 C67.1@5071.3,-6844 ; 5071.3,-6929 C67.1@5071.3,-6844 ; 5071.3,-6929 5076.6,-6934.3 ; C67.1@5071.3,-6844 C67.1@5076.6,-6849.3 ; 5076.6,-6946.1 5076.6,-6934.3 ; 5076.6,-6946.1 5081.3,-6941.4 ; 5076.6,-6946.1 C67.1@5076.6,-6849.3 ; 5076.6,-6934.3 C67.1@5076.6,-6849.3 ; C67.1@5076.6,-6849.3 5081.3,-6854 5081.3,-6941.4 ; 5081.3,-6941.4 5092.5,-6930.2 5092.5,-6810.2 C67.1@5087.5,-6810.2
USB_SW_1: R99.2 U1.33 U22.4 | length 5807.3
  Top Layer w10: v1(4095,-6780) 4102.5,-6780 4125,-6802.5 4287.5,-6802.5 4427.5,-6942.5 4642.5,-6942.5 4727.6,-7027.6 4727.6,-7040.1 4738.9,-7051.4 U22.4@4738.9,-7102.4 ; v1(4355,-5077.5) 4380,-5052.5 4485,-5052.5 4512.5,-5025 4512.5,-4395 4552.5,-4355 4552.5,-3337.5 4572.5,-3317.5 4572.5,-3037.5 4517.5,-2982.5 v1(4517.5,-2890) ; v1(5040,-2915) 5129.1,-3004.1 U1.33@5129.1,-3099.6
  Mid-Layer 2 w10: v1(4095,-6780) 4087.5,-6772.5 4087.5,-5505 4122.5,-5470 4225,-5470 4325,-5370 4325,-5107.5 v1(4355,-5077.5)
  Bottom Layer w10: v1(4517.5,-2890) 5015,-2890 v1(5040,-2915)
VBUS: D7.1 R21.1 R100.2 | length 6931.4
  Top Layer w12: v1(5335,-2867.5) R21.1@5335,-2707.5
  Mid-Layer 2 w12: v1(5080,-7615) 5080,-7635 5102.5,-7657.5 5132.5,-7657.5 5147.5,-7642.5 5375,-7642.5 5395,-7662.5 6205.47,-7662.5 6212.5,-7655.47 6212.5,-7552.88 6219.53,-7545.85 6370.26,-7545.85 6377.29,-7538.82 6377.29,-5427.29 6335,-5385 6335,-4392.5 5627.5,-3685 v1(5627.5,-3082.5)
  Bottom Layer w12: R100.2@5052.5,-7570 R100.2@5058.5,-7570 D7.1@5080,-7570 ; v1(5080,-7615) D7.1@5080,-7570 ; D7.1@5097.5,-7552.5 D7.1@5080,-7570 ; v1(5335,-2867.5) 5537.5,-2867.5 5627.5,-2957.5 v1(5627.5,-3082.5)
VSYS: C55.1 C62.1 C69.1 C70.1 C75.1 C125.1 C130.1 D5.1 D6.1 JP1.1 L3.2 L22.1 R60.1 R77.1 R82.1 R88.1 R97.1 U17.1 U17.2 U18.3 U18.4 U18.5 U19.6 U21.15 U21.16 U22.5 U35.5 ~FV6.FV ~FV7.FV ~FV8.FV | length 29986.5
  Top Layer w7: U21.15@5146.5,-7052.5 U21.15@5146.5,-7050.2 ; C69.1@5212.96,-7038.91 C69.1@5210.3,-7036.7 ; C69.1@5217.5,-7045.2 5146.5,-7045.2 ; C70.1@5260,-7042.7 5240,-7042.7 C69.1@5217.5,-7042.7 ; C70.1@5266.85,-7038.35 5272.5,-7032.7 C70.1@5272.5,-7029.2 ; C70.1@5272.5,-7020.2 5240,-7020.2 ; 5300,-7020.2 5350,-7020.2 ; 5390,-7020.2 5397.5,-7020.2 ; 5407.5,-7020.2 5411.25,-7016.45 ; 5417.5,-7000.2 5397.5,-7020.2 ; 5417.5,-6920.2 5417.5,-6912.7 5425,-6920.2 5437.5,-6932.7 ; 5437.5,-7050.2 5435,-7050.2 ; 5437.5,-7040.2 5437.5,-7047.7 5435,-7050.2 ; 5437.5,-6990.2 5437.5,-6932.7 ; L3.2@5437.5,-6837.5 5437.5,-6932.7 ; 5442.5,-7050.2 5457.5,-7050.2 ; 5442.5,-7040.2 5442.5,-7037.6 ; 5442.5,-7030.2 5442.5,-6997.7 ; 5442.5,-6980.2 5442.5,-6950 L3.2@5442.5,-6837.5 ; L3.2@5442.5,-6800 L3.2@5442.5,-6793.2 ; 5447.5,-7037.6 5447.5,-7035.2 v1@5447.5,-6992.7 ; v1@5457.5,-6992.7 5457.5,-7037.6 5457.5,-7050.2 ; 5652.5,-6782.5 5652.5,-6932.5 5652.5,-6937.5 5633.7,-6956.3 5605,-6985 5580,-7010 5552.5,-7037.5 5539.8,-7050.2 5457.5,-7050.2 ; U21.15@5146.5,-7050.2 5217.5,-7050.2 C70.1@5250,-7050.2 ; U21.15@5146.5,-7050.2 5146.5,-7045.2 ; 5146.5,-7045.2 5146.5,-7042.7 ; 5146.5,-7042.7 C69.1@5217.5,-7042.7 ; 5146.5,-7042.7 U21.16@5146.5,-7036.7 5191,-7036.7 ; 5191,-7036.7 C69.1@5210.3,-7036.7 ; 5191,-7036.7 5200,-7027.7 ; 5200,-7027.7 C69.1@5207.5,-7020.2 ; 5200,-7027.7 5202.5,-7030.2 C69.1@5210.3,-7036.7 ; C69.1@5207.5,-7020.2 5240,-7020.2 ; C69.1@5207.5,-7020.2 C69.1@5214.8,-7036.7 ; C69.1@5214.8,-7036.7 C69.1@5217.5,-7042.7 ; C69.1@5214.8,-7036.7 ~FV7.FV@5240,-7036.7 ; ~FV7.FV@5240,-7036.7 5256.5,-7036.7 5262.5,-7042.7 5260,-7045.2 C70.1@5255,-7050.2 ; ~FV7.FV@5240,-7036.7 v1(5240,-7035.2) 5240,-7020.2 ; C70.1@5250,-7050.2 5252.5,-7050.2 C70.1@5255,-7050.2 ; C70.1@5250,-7050.2 5252.5,-7052.7 C70.1@5255,-7050.2 ; C70.1@5255,-7050.2 5268.7,-7050.2 5305,-7050.2 5345,-7050.2 5355,-7050.2 5367.5,-7050.2 ; 5367.5,-7050.2 5377.5,-7050.2 5405,-7050.2 5432.5,-7050.2 5435,-7050.2 ; 5367.5,-7050.2 5377.5,-7040.2 5390,-7027.7 5397.5,-7020.2
  Top Layer w9: 5094.9,-5837.5 5092.4,-5837.5 ; 5097.4,-5835 5137.3,-5835 5141.1,-5838.8 ; 5109.85,-5820.05 5096.15,-5833.75 5094.25,-5835.65 5092.4,-5837.5 ; 5117.4,-5640 5177.4,-5640 5169.9,-5632.5 5117.4,-5632.5 ; 5117.4,-5610 5149.9,-5610 5172.4,-5610 5177.4,-5622.5 ; C130.1@5117.4,-5605 5117.4,-5475 C62.1@5123.6,-5468.8 ; C130.1@5137.4,-5592.5 C130.1@5132.4,-5595.6 ; 5141.2,-5821.3 5111.1,-5821.3 5118.6,-5813.8 ; 5146.1,-5808.8 5123.6,-5808.8 ; 5149.9,-5812.5 5148.6,-5813.8 5118.6,-5813.8 ; 5149.9,-5550 5147.4,-5547.5 5132.4,-5547.5 ; C62.1@5149.9,-5497.5 5132.4,-5515 5132.4,-5547.5 ; 5167.4,-5847.5 5132.4,-5847.5 5024.9,-5847.5 ; 5176.1,-5838.8 5141.1,-5838.8 ; 5177.4,-5857.5 5167.4,-5867.5 5156.8,-5878.1 U18.3@5024.9,-5878.1 ; 5177.4,-5790 5149.9,-5790 5139.9,-5790 ; 5177.4,-5777.5 5164.9,-5777.5 ; 5177.4,-5752.5 5152.4,-5777.5 ; C62.1@5177.4,-5500 5187.4,-5500 ; 5186.1,-5848.8 5204.9,-5830 5217.4,-5817.5 5217.4,-5542.5 5204.9,-5542.5 ; 5204.9,-5517.5 5187.4,-5500 ; 5204.9,-5357.5 5189.9,-5357.5 5187.4,-5360 ; 5217.4,-5360 5217.4,-5357.5 5217.4,-5350 5204.9,-5350 5187.4,-5350 5147.4,-5390 C62.1@5147.4,-5400 ; v1(5382.5,-1647.5) 5382.5,-1630 5416.5,-1596 U19.6@5444,-1596 ; 5012.4,-5847.5 5019.9,-5847.5 ; 5012.4,-5847.5 U18.5@5012.4,-5838.8 U18.5@5019.9,-5838.8 ; 5012.4,-5847.5 U18.4@5012.4,-5858.4 U18.3@5012.4,-5878.1 U18.3@5019.9,-5878.1 ; U18.3@5019.9,-5878.1 5019.9,-5858.4 5019.9,-5847.5 ; U18.3@5019.9,-5878.1 U18.3@5024.9,-5878.1 ; 5019.9,-5847.5 U18.5@5019.9,-5838.8 ; 5019.9,-5847.5 5024.9,-5847.5 ; U18.5@5019.9,-5838.8 5027.4,-5838.8 ; U18.3@5024.9,-5878.1 5024.9,-5847.5 ; 5024.9,-5847.5 5024.9,-5841.3 5027.4,-5838.8 ; 5027.4,-5838.8 5091.1,-5838.8 ; 5091.1,-5838.8 5097.4,-5838.8 5137.3,-5838.8 5141.1,-5838.8 ; 5091.1,-5838.8 5092.4,-5837.5 ; 5118.6,-5813.8 5123.6,-5808.8 ; 5123.6,-5808.8 5132.4,-5800 5129.9,-5800 5139.9,-5790 ; 5123.6,-5547.5 5123.6,-5601.1 5129.9,-5597.2 C130.1@5132.4,-5595.6 ; 5123.6,-5547.5 5129.9,-5547.5 5132.4,-5547.5 ; 5123.6,-5547.5 C62.1@5123.6,-5468.8 ; C62.1@5123.6,-5468.8 C62.1@5147.4,-5445 C62.1@5147.4,-5400 ; C130.1@5132.4,-5595.6 5132.4,-5547.5 ; 5139.9,-5790 5146.2,-5783.7 ; 5146.2,-5783.7 5152.4,-5777.5 ; 5146.2,-5783.7 5171.1,-5783.7 5164.9,-5777.5 ; C62.1@5147.4,-5400 5187.4,-5360 ; 5152.4,-5777.5 5164.9,-5777.5 ; 5187.4,-5500 5187.4,-5360
  Top Layer w10: v1(4707.6,-7077.6) 4719.2,-7089.2 U22.5@4719.2,-7102.4
  Top Layer w12: U17.1@5640,-5157.5 5640,-5235 5665.6,-5209.4 U17.2@5665.6,-5157.5
  Top Layer w20: v1(5300,-7035.2) v1@5305,-7040.2 ; v1@5397.5,-7027.7 5390,-7027.7 5350,-7027.7 5300,-7027.7 5274,-7027.7 5272.5,-7029.2 5265.3,-7036.4 5265.2,-7036.7 5266.9,-7038.4 5268.7,-7040.2 v1@5305,-7040.2 ; v1(5400,-7035.2) v1@5405,-7040.2 ; v1@5405,-7027.7 5417.5,-7027.7 ; 5425,-7002.7 5425,-6920.2 ; L3.2@5432,-6835.2 L3.2@5432.5,-6835.7 ; L3.2@5432.5,-6837.5 L3.2@5432.5,-6835.7 ; 5442.5,-7030.2 5437.5,-7035.2 5432.5,-7040.2 v1@5405,-7040.2 ; 5442.5,-6990.2 5450,-6982.7 v1@5452.5,-6980.2 ; v1@5447.5,-6992.7 5442.5,-6997.7 5431.25,-7008.95 5425,-7015.2 ; v1(5452.5,-6985.2) v1@5452.5,-6980.2 ; L3.2@5452.5,-6837.5 v1(5452.5,-6950) v1@5452.5,-6980.2 ; 5517.5,-6870 5517.5,-6840 5520,-6837.5 ; 5537.5,-7037.5 5565,-7010 ; 5547.5,-7005 5557.5,-6995 5567.5,-6985 5572.5,-6980 5625,-6927.5 5625,-6782.5 ; 5585,-6800 5452.5,-6800 5452.5,-6793.2 5452.5,-6782.5 5440.2,-6775.2 5415,-6775.2 5415,-6792.4 5415,-6799.7 5422.3,-6792.4 5432.5,-6802.6 5432.5,-6815 L3.2@5432.5,-6835.7 ; 5590,-6985 5626.2,-6948.8 5642.5,-6932.5 5642.5,-6782.5 ; v1@5305,-7040.2 5345,-7040.2 ~FV8.FV@5350,-7035.2 5355,-7040.2 5367.5,-7040.2 5377.5,-7040.2 v1@5405,-7040.2 ; 5417.5,-7027.7 5425,-7027.7 5425,-7015.2 ; 5417.5,-7027.7 5417.5,-7022.7 5425,-7015.2
  Top Layer w25: 5204.9,-5360 5204.9,-5357.5 ; 5725,-5385 5725,-5382.5 5747.5,-5382.5 ; 5807.5,-5850 5807.5,-5707.5 5807.5,-5682.5 ; 5830,-5872.5 5830,-5710 ; 5832.5,-5687.5 5830,-5687.5 ; 5865,-5907.5 5880,-5907.5 ; U35.5@5925.5,-5637.5 5867.5,-5637.5 ; 5965,-5960 5961.2,-5963.7 ; 5975,-5885 5850,-5885 5850,-5867.5 5860,-5867.5 6032.5,-5867.5 L22.1@6060,-5867.5 ; 6007.5,-5885 L22.1@6060,-5885 ; L22.1@6060,-5855 6032.5,-5855 5860,-5855 5850,-5855 C125.1@5850,-5710 ; L22.1@6070,-5867.5 6097.5,-5867.5 L22.1@6097.5,-5862.5 ; L22.1@6070,-5855 L22.1@6097.5,-5855 ; L22.1@6097.5,-5885 L22.1@6175,-5885 ; 6125,-6065 6135,-6055 6135,-5907.5 ; 6257.5,-6285 5880,-5907.5 ; 6257.5,-6260 6022.5,-6025 ; 6257.5,-6232.5 6045,-6020 6045,-5907.5 ; 5747.5,-5382.5 5747.5,-5637.5 5750,-5637.5 ; 5747.5,-5382.5 5765,-5382.5 ; 5750,-5637.5 5765,-5637.5 ; 5750,-5637.5 5728.8,-5658.7 5811.2,-5658.7 5830,-5677.5 ; 5765,-5637.5 5765,-5382.5 ; 5765,-5637.5 5785,-5637.5 ; 5765,-5382.5 5785,-5382.5 ; 5785,-5637.5 5790,-5637.5 5807.5,-5637.5 5807.5,-5382.5 ; 5785,-5637.5 5785,-5382.5 ; 5785,-5382.5 5807.5,-5382.5 ; 5807.5,-5382.5 5830,-5382.5 5830,-5637.5 ; 5830,-5710 5830,-5687.5 ; 5830,-5710 C125.1@5850,-5710 ; 5830,-5687.5 5830,-5677.5 ; 5830,-5677.5 5830,-5637.5 ; 5830,-5637.5 5850,-5637.5 ; C125.1@5850,-5710 5850,-5687.5 5850,-5637.5 ; 5850,-5637.5 5867.5,-5637.5 ; 5867.5,-5637.5 5867.5,-5705 5867.5,-5710 5867.5,-5837.5 6097.5,-5837.5 L22.1@6097.5,-5855 ; 5880,-5907.5 5905,-5907.5 ; 5905,-5907.5 5987.5,-5907.5 ; 5905,-5907.5 5961.2,-5963.7 ; 5961.2,-5963.7 5987.5,-5990 ; 5987.5,-5990 5987.5,-5907.5 ; 5987.5,-5990 6022.5,-6025 ; 5987.5,-5907.5 6022.5,-5907.5 ; 6022.5,-6025 6022.5,-5907.5 ; 6022.5,-5907.5 6045,-5907.5 ; 6045,-5907.5 6135,-5907.5 ; L22.1@6097.5,-5862.5 L22.1@6175,-5885 ; L22.1@6097.5,-5862.5 L22.1@6097.5,-5855 ; 6135,-5907.5 6175,-5907.5 L22.1@6175,-5885
  Top Layer w30: JP1.1@3740,-6926 3806,-6926 4100,-7220 4207.5,-7220 ; v1(4417.5,-7212.5) 4410,-7220 4207.5,-7220 ; v1(4710.1,-6957.6) 4715.2,-6952.5 R88.1@4785,-6952.5 ; 5132.4,-5847.5 5141.1,-5838.8 5149.9,-5830 5149.9,-5812.5 5149.9,-5805 ; 5149.9,-5610 5149.9,-5592.5 5149.9,-5550 5149.9,-5497.5 5149.9,-5447.5 C62.1@5147.4,-5445 5127.5,-5425.1 5127.5,-5340 5187.4,-5340 5204.9,-5340 5217.4,-5340 5612.5,-5340 ; 5167.4,-5867.5 5219.9,-5867.5 ; 5167.4,-5847.5 5176.1,-5838.8 5177.4,-5837.5 5177.4,-5790 5177.4,-5777.5 5177.4,-5752.5 5177.4,-5640 5177.4,-5622.5 ; 5204.9,-5360 5221.15,-5376.25 ; D5.1@5207.5,-7345.5 5207.5,-7622.5 ; 5285,-5867.5 5259.9,-5867.5 5219.9,-5867.5 ; 5362.5,-5867.5 5362.5,-5410 5387.5,-5410 ; R77.1@5382.5,-1672.5 v1(5382.5,-1647.5) ; L3.2@5432.5,-6837.5 5437.5,-6837.5 5442.5,-6837.5 5452.5,-6837.5 5457.5,-6837.5 5520,-6837.5 ; L3.2@5432.5,-6815 5442.5,-6815 5447.5,-6815 L3.2@5447.5,-6802.6 ; v1(5437.5,-7622.5) v1(5412.5,-7622.5) 5207.5,-7622.5 ; 5437.5,-7035.2 5439.9,-7037.6 5442.5,-7037.6 5447.5,-7037.6 ; 5452.5,-6782.5 5625,-6782.5 5642.5,-6782.5 5652.5,-6782.5 ; 5517.5,-6870 5533.75,-6853.75 5558.7,-6828.8 5558.7,-6868.8 5547.5,-6880 5547.5,-6985 5567.5,-6985 5590,-6985 5605,-6985 5720,-6985 5735,-6970 6282.5,-6970 6282.5,-6995 6282.5,-7017.5 6282.5,-7037.5 6307.5,-7037.5 6307.5,-6832.5 ; 5547.5,-5272.5 5515,-5272.5 5547.5,-5240 5548.7,-5238.7 ; R82.1@5562.5,-1900 v1(5597.5,-1900) R97.1@5632.5,-1900 ; 5633.7,-6956.3 5702.5,-6956.3 5702.5,-6782.5 5725,-6782.5 5725,-6860 6282.5,-6860 6282.5,-6832.5 ; R60.1@5640,-5235 C55.1@5640,-5275 ; v1(5697.5,-3607.5) v1(5697.5,-3632.5) 5697.5,-4377.5 5555,-4520 5555,-5105.71 5548.7,-5112.01 5548.7,-5238.7 ; v1(5697.5,-3050) v1(5697.5,-3025) v1(5697.5,-2925) v1(5697.5,-2900) ; 5725,-5385 5667.5,-5385 5640,-5357.5 5640,-5312.5 C55.1@5640,-5275 ; 5735,-5702.5 5735,-5777.5 ; 5760,-5702.5 5760,-5802.5 ; 5787.5,-5702.5 5802.5,-5702.5 5807.5,-5707.5 ; 5832.5,-5687.5 5850,-5687.5 C125.1@5867.5,-5705 ; 5860,-5867.5 5860,-5855 5860,-5845 5867.5,-5837.5 ; 5975,-5885 6007.5,-5885 ; 5990,-6807.5 5996.2,-6801.2 6027.5,-6832.5 6282.5,-6832.5 ; L22.1@6032.5,-5867.5 L22.1@6032.5,-5855 ; L22.1@6060,-5885 6060,-5867.5 6060,-5865 L22.1@6070,-5855 ; 6175,-5907.5 6175,-6095 6230,-6095 6257.5,-6095 6282.5,-6095 ; 4207.5,-7220 D6.1@4207.5,-7403.5 4207.5,-7575 4247.5,-7615 4360,-7615 4410,-7665 4548,-7665 4602.5,-7719.5 4910,-7719.5 4964.5,-7665 5082.5,-7665 5125,-7622.5 5207.5,-7622.5 ; 5219.9,-5867.5 5219.9,-5830 5219.9,-5542.5 5219.9,-5517.5 5219.9,-5377.5 5221.2,-5376.2 5222.4,-5375 5257.4,-5375 5257.4,-5360 5259.9,-5360 5612.5,-5360 ; 5387.5,-5410 5657.5,-5410 5612.5,-5365 5612.5,-5360 ; 5387.5,-5410 5387.5,-5867.5 5412.5,-5867.5 5412.5,-5632.5 5590,-5632.5 5660,-5702.5 5735,-5777.5 ; 5548.7,-5238.7 5607.5,-5297.5 C55.1@5612.5,-5302.5 ; 5612.5,-5360 5612.5,-5340 ; 5612.5,-5340 C55.1@5612.5,-5302.5 ; C55.1@5612.5,-5302.5 C55.1@5640,-5275 ; 5735,-5777.5 5760,-5802.5 ; 5760,-5802.5 5807.5,-5850 5830,-5872.5 5846.25,-5888.75 5865,-5907.5 6250,-6292.5 6258.75,-6301.25 6282.5,-6325 6282.5,-6095 ; 6282.5,-6832.5 6307.5,-6832.5 ; 6282.5,-6095 6307.5,-6095 6307.5,-6832.5
  Mid-Layer 2 w30: v1(5382.5,-1647.5) 5382.5,-1617.5 5412.5,-1587.5 5567.5,-1587.5 5620,-1640 5620,-1877.5 v1(5597.5,-1900) 5557.5,-1940 5557.5,-2760 v1(5697.5,-2900) v1(5697.5,-2925) ; v1(5412.5,-7622.5) v1(5437.5,-7622.5) 5495,-7565 5495,-7077.9 5452.3,-7035.2 ; v1(5452.5,-6950) v1(5452.5,-6985.2) 5452.5,-7035 5452.3,-7035.2 ; v1(5697.5,-3632.5) v1(5697.5,-3607.5) v1(5697.5,-3050) v1(5697.5,-3025) ; v1(5300,-7035.2) v1(5240,-7035.2) v1(5300,-7035.2) ; v1(5300,-7035.2) ~FV8.FV@5350,-7035.2 v1(5400,-7035.2) 5452.3,-7035.2
  Bottom Layer w30: v1(4417.5,-7212.5) 4517.5,-7112.5 4700.2,-7112.5 4707.6,-7105.1 v1(4707.6,-7077.6) 4707.6,-6960.1 v1(4710.1,-6957.6)
WR_1: J1.18 U1.8 | length 2402.2
  Top Layer w10: U1.8@5335.6,-3503.1 5455.6,-3503.1 5472.5,-3520 5500,-3520 v1(5510,-3510)
  Mid-Layer 2 w10: v1(4845,-4415) 4845,-4375 4862.5,-4357.5 5000,-4357.5 5477.5,-3880 5477.5,-3677.5 5487.5,-3667.5 5487.5,-3532.5 v1(5510,-3510)
  Bottom Layer w10: J1.18@4063.7,-4767 4063.7,-4728.8 4385,-4407.5 4837.5,-4407.5 v1(4845,-4415)
XL_1: C29.1 J1.2 R1.1 U3.1 U6.16 | length 1058.3
  Top Layer w10: U6.16@3925.8,-5173 3925.8,-5166.7 3975,-5117.5 4022.5,-5117.5 ; R1.1@4022.5,-5067.5 4022.5,-5117.5 ; C29.1@4062.5,-5047.5 4062.5,-5080 ; v1(4477.5,-4940) 4322.5,-4940 4182.5,-5080 4062.5,-5080 ; 4022.5,-5117.5 U3.1@4047,-5117.5 4062.5,-5102 4062.5,-5080
  Bottom Layer w10: v1(4477.5,-4940) 4535,-4882.5 4617.5,-4882.5 4694.1,-4805.9 J1.2@4694.1,-4767
XR_1: J1.5 U5.1 U6.15 | length 825.6
  Top Layer w10: U6.15@3963.8,-5211 3979,-5211 3997.5,-5192.5 U5.1@4047,-5192.5 4084.5,-5155 4175,-5155 4362.5,-4967.5 v1(4372.5,-4967.5)
  Bottom Layer w10: v1(4372.5,-4967.5) 4380,-4967.5 4512.5,-4835 4558.4,-4835 4575.9,-4817.5 J1.5@4575.9,-4767
YD_1: C28.1 J1.3 U2.1 U6.13 | length 1007.1
  Top Layer w10: U6.13@3963.8,-5250.4 4029.9,-5250.4 U2.1@4047,-5267.5 ; C28.1@4047.5,-5317.5 4047.5,-5268 U2.1@4047,-5267.5 ; v1(4417.5,-4967.5) 4387.5,-4997.5 4365,-4997.5 4202.5,-5160 4202.5,-5200 4172.5,-5230 4084.5,-5230 U2.1@4047,-5267.5
  Bottom Layer w10: v1(4417.5,-4967.5) 4417.5,-4962.5 4522.5,-4857.5 4607.2,-4857.5 4654.7,-4810 J1.3@4654.7,-4767
YU_1: J1.1 U4.1 U6.12 | length 1287.4
  Top Layer w10: U6.12@3963.8,-5270.1 4000.1,-5270.1 4010,-5280 4010,-5343 U4.1@4047,-5380 4087,-5420 4182.5,-5420 4235,-5367.5 4235,-5160 4375,-5020 4405,-5020 4452.5,-4972.5 v1(4452.5,-4967.5)
  Bottom Layer w10: v1(4452.5,-4967.5) 4487.5,-4967.5 4547.5,-4907.5 4633.5,-4907.5 4733.5,-4807.5 J1.1@4733.5,-4767
pads on no net: ANT1.2 D2.2 D3.2 J1.6 MTHole3.MTHole3 MTHole4.MTHole4 MTHole5.MTHole5 MTHole6.MTHole6 MTHole7.MTHole7 MTHole8.MTHole8 TestPoint13.TestPoint13 TestPoint14.TestPoint14 TestPoint15.TestPoint15 TestPoint16.TestPoint16 TestPoint17.TestPoint17 TestPoint18.TestPoint18 U1.22 U1.34 U1.69 U6.7 U6.9 U8.2 U8.3 U8.4 U8.5 U8.11 U8.15 U8.24 U8.25 U8.28 U8.29 U8.31 U8.33 U8.34 U8.35 U9.1 U10.4 U10.5 U10.11 U10.12 U10.13 U11.1 U11.5 U11.6 U11.15 U11.16 U11.17 U11.18 U11.19 U12.5 U12.11 U12.12 U12.14 U13.13 U13.15 U13.16 U13.17 U13.18 U13.19 U13.20 U15.8 U19.9 U23.A2 U23.A3 U23.A8 U23.A10 U23.A11 U23.B2 U23.B3 U23.B8 U23.B10 U23.B11 U23.Hole1 U23.Hole2 U25.2 U25.4 U25.9 U25.11 U31.4 U34.4 U34.5 U34.11 U34.12 U34.13
copper on no net: | length 78390.2
  Top Layer w8: 3115.5,-7605.5 3115.5,-7703.5 3205.5,-7703.5 ; 3115.5,-7578.5 3240.5,-7703.5 4545.5,-7703.5 4545.5,-7846.5 4969.5,-7846.5 4969.5,-7703.5 6274.5,-7703.5 6399.5,-7578.5 6399.5,-1793.5 5896.5,-1793.5 5896.5,-1352.5 4217.5,-1352.5 4217.5,-1422.5 3618.5,-1422.5 3618.5,-1793.5 3115.5,-1793.5 3115.5,-7578.5
  Mid-Layer 1 w8: 3115.5,-7605.5 3115.5,-7703.5 3205.5,-7703.5 ; 3115.5,-7578.5 3240.5,-7703.5 4545.5,-7703.5 4545.5,-7846.5 4969.5,-7846.5 4969.5,-7703.5 6274.5,-7703.5 6399.5,-7578.5 6399.5,-1793.5 5896.5,-1793.5 5896.5,-1352.5 4217.5,-1352.5 4217.5,-1422.5 3618.5,-1422.5 3618.5,-1793.5 3115.5,-1793.5 3115.5,-7578.5
  Mid-Layer 2 w8: 3115.5,-7605.5 3115.5,-7703.5 3205.5,-7703.5 ; 3115.5,-7578.5 3240.5,-7703.5 4545.5,-7703.5 4545.5,-7846.5 4969.5,-7846.5 4969.5,-7703.5 6274.5,-7703.5 6399.5,-7578.5 6399.5,-1793.5 5896.5,-1793.5 5896.5,-1352.5 4217.5,-1352.5 4217.5,-1422.5 3618.5,-1422.5 3618.5,-1793.5 3115.5,-1793.5 3115.5,-7578.5
  Bottom Layer w8: 3115.5,-7605.5 3115.5,-7703.5 3205.5,-7703.5 ; 3115.5,-7578.5 3240.5,-7703.5 4545.5,-7703.5 4545.5,-7846.5 4969.5,-7846.5 4969.5,-7703.5 6274.5,-7703.5 6399.5,-7578.5 6399.5,-1793.5 5896.5,-1793.5 5896.5,-1352.5 4217.5,-1352.5 4217.5,-1422.5 3618.5,-1422.5 3618.5,-1793.5 3115.5,-1793.5 3115.5,-7578.5
  other v1: 5155,-6705 3970,-6655 3970,-6605 3970,-6555

## Polygon pours and split planes (outlines as drawn)
GND on Bottom Layer "obs1484" (hatched Vertical grid 10 track 10, pour order 255): 4435,-3880 4435,-2127.5 3185,-2127.5 3185,-3880
GND on Bottom Layer "obs1486" (hatched Vertical grid 10 track 10, pour order 256): 5747.5,-5545 5747.5,-6087.5 6397.5,-6087.5 6397.5,-7577.5 6275,-7700 4992.5,-7700 4992.5,-7837.5 4525,-7837.5 4525,-7702.5 3245,-7702.5 3117.5,-7575 3117.5,-1795 3620,-1795 3620,-1367.5 5892.5,-1367.5 5892.5,-1792.5 6400,-1792.5 6400,-3465 5747.5,-3465 5747.5,-4250 5587.5,-4410 5587.5,-5385
FIELDGND on Bottom Layer "obs1489" (hatched Vertical grid 10 track 10, pour order 257): 5852.5,-5535 5852.5,-6030 6397.5,-6030 6397.5,-3647.5 6217.5,-3647.5 6117.5,-3547.5 5815,-3547.5 5815,-4305 5655,-4465 5655,-5337.5
N00171 on Mid-Layer 2 "obs1485" (hatched Vertical grid 10 track 10, pour order 258): 4857.5,-7257.5 4857.5,-6675 5145,-6675 5145,-6945 5175,-6945 5175,-7100 5412.5,-7100 5412.5,-7652.5 4500,-7652.5 4500,-7257.5
GND on Mid-Layer 1 "obs1487" (hatched Vertical grid 10 track 10, pour order 259): 5747.5,-5545 5747.5,-6087.5 6397.5,-6087.5 6397.5,-7577.5 6275,-7700 4992.5,-7700 4992.5,-7837.5 4525,-7837.5 4525,-7702.5 3242.5,-7702.5 3117.5,-7577.5 3117.5,-1795 3620,-1795 3620,-1367.5 5892.5,-1367.5 5892.5,-1792.5 6400,-1792.5 6400,-3465 5747.5,-3465 5747.5,-4250 5587.5,-4410 5587.5,-5385
FIELDGND on Mid-Layer 1 "obs1488" (hatched Vertical grid 10 track 10, pour order 260): 5852.5,-5535 5852.5,-6030 6397.5,-6030 6397.5,-3647.5 6215,-3647.5 6115,-3547.5 5815,-3547.5 5815,-4305 5655,-4465 5655,-5337.5
GND on Top Layer "GND_L01_P262" (solid, pour order 262): 6375,-7535 6200,-7535 6200,-7662.88 3305,-7662.88 3305,-7535 3149.68,-7535 3151.37,-5587.1 4111.65,-5587.1 4260,-5438.75 4260,-5168.75 4331.65,-5097.1 4496.65,-5097.1 4566.65,-5027.1 4566.65,-4882.1 5526.65,-4882.1 5526.65,-5222.1 6375,-5222.1
no net on Internal Plane 2 (split plane): 7531.91,-268.38 7533.53,-269.47 7534.62,-271.09 7534.93,-272.69 7534.9,-273 7534.9,-8472 7534.93,-8472.31 7534.62,-8473.91 7533.53,-8475.53 7531.91,-8476.62 7530.31,-8476.93 7530,-8476.9 2100,-8476.9 2099.69,-8476.93 2098.09,-8476.62 2096.47,-8475.53 2095.38,-8473.91 2095.07,-8472.31 2095.1,-8472 2095.1,-273 2095.07,-272.69 2095.38,-271.09 2096.47,-269.47 2098.09,-268.38 2099.69,-268.07 2100,-268.1 7530,-268.1 7530.31,-268.07
no net on Internal Plane 2 (split plane): 5892.42,-1793.5 5892.73,-1795.06 5893.62,-1796.38 5894.94,-1797.27 5896.5,-1797.58 6395.42,-1797.58 6395.42,-7576.81 6272.81,-7699.42 4969.5,-7699.42 4967.94,-7699.73 4966.62,-7700.62 4965.73,-7701.94 4965.42,-7703.5 4965.42,-7842.42 4549.58,-7842.42 4549.58,-7703.5 4549.27,-7701.94 4548.38,-7700.62 4547.06,-7699.73 4545.5,-7699.42 3242.19,-7699.42 3119.58,-7576.81 3119.58,-1797.58 3618.5,-1797.58 3620.06,-1797.27 3621.38,-1796.38 3622.27,-1795.06 3622.58,-1793.5 3622.58,-1426.58 4217.5,-1426.58 4219.06,-1426.27 4220.38,-1425.38 4221.27,-1424.06 4221.58,-1422.5 4221.58,-1356.58 5892.42,-1356.58
no net on Internal Plane 1 (split plane): 7531.91,-268.38 7533.53,-269.47 7534.62,-271.09 7534.93,-272.69 7534.9,-273 7534.9,-8472 7534.93,-8472.31 7534.62,-8473.91 7533.53,-8475.53 7531.91,-8476.62 7530.31,-8476.93 7530,-8476.9 2100,-8476.9 2099.69,-8476.93 2098.09,-8476.62 2096.47,-8475.53 2095.38,-8473.91 2095.07,-8472.31 2095.1,-8472 2095.1,-273 2095.07,-272.69 2095.38,-271.09 2096.47,-269.47 2098.09,-268.38 2099.69,-268.07 2100,-268.1 7530,-268.1 7530.31,-268.07
no net on Internal Plane 1 (split plane): 5892.42,-1793.5 5892.73,-1795.06 5893.62,-1796.38 5894.94,-1797.27 5896.5,-1797.58 6395.42,-1797.58 6395.42,-7576.81 6272.81,-7699.42 4969.5,-7699.42 4967.94,-7699.73 4966.62,-7700.62 4965.73,-7701.94 4965.42,-7703.5 4965.42,-7842.42 4549.58,-7842.42 4549.58,-7703.5 4549.27,-7701.94 4548.38,-7700.62 4547.06,-7699.73 4545.5,-7699.42 3242.19,-7699.42 3119.58,-7576.81 3119.58,-1797.58 3618.5,-1797.58 3620.06,-1797.27 3621.38,-1796.38 3622.27,-1795.06 3622.58,-1793.5 3622.58,-1426.58 4217.5,-1426.58 4219.06,-1426.27 4220.38,-1425.38 4221.27,-1424.06 4221.58,-1422.5 4221.58,-1356.58 5892.42,-1356.58

## Keep-outs
Keep-Out Layer:
  lines w50: 2100,-8472 2100,-273 7530,-273 7530,-8472 2100,-8472

## Other copper
Top Layer:
  text "00-60163 REV.B" at 6990.05,-4902.68 h75 r90
  text "COMPONENT SIDE" at 6815.05,-5015.18 h75 r90
  text "BLUE SLEUTH PRO LiPo" at 6640.05,-5069.35 h75 r90
Mid-Layer 1:
  text "00-60163 REV.B" at 6990.05,-4902.68 h75 r90
  text "INTERNAL 1 (GND)" at 6822.55,-5033.23 h75 r90
  text "BLUE SLEUTH PRO LiPo" at 6640.05,-5069.35 h75 r90
Mid-Layer 2:
  text "00-60163 REV.B" at 6990.05,-4902.68 h75 r90
  text "INTERNAL 2 (POWER)" at 6822.55,-5063.8 h75 r90
  text "BLUE SLEUTH PRO LiPo" at 6640.05,-5069.35 h75 r90
Bottom Layer:
  pour cut-out: 3806.33,-2726.17 3807.91,-2730 3807.91,-2812.5 3806.33,-2816.33 3802.5,-2817.91 3740,-2817.91 3736.17,-2816.33 3734.59,-2812.5 3734.59,-2734.21 3733.67,-2733.83 3732.09,-2730 3733.67,-2726.17 3737.5,-2724.59 3802.5,-2724.59
  pour cut-out: 3636.33,-2968.67 3637.91,-2972.5 3637.91,-3042.5 3636.33,-3046.33 3632.5,-3047.91 3535,-3047.91 3531.17,-3046.33 3529.59,-3042.5 3529.59,-2972.5 3531.17,-2968.67 3535,-2967.09 3632.5,-2967.09
  pour cut-out: 4001.33,-4556.17 4023.83,-4578.67 4025.41,-4582.5 4025.41,-4695 4023.83,-4698.83 4006.33,-4716.33 4002.5,-4717.91 3972.5,-4717.91 3968.67,-4716.33 3898.67,-4646.33 3897.09,-4642.5 3897.09,-4560 3898.67,-4556.17 3902.5,-4554.59 3997.5,-4554.59
  pour cut-out: 4928.83,-3493.67 4936.33,-3501.17 4937.91,-3505 4937.91,-3540 4936.33,-3543.83 4932.5,-3545.41 4880,-3545.41 4876.17,-3543.83 4874.59,-3540 4874.59,-3497.5 4876.17,-3493.67 4880,-3492.09 4925,-3492.09
  pour cut-out: 4877.71,-3978.21 4878.83,-3978.67 4883.83,-3983.67 4885.41,-3987.5 4885.41,-4035 4883.83,-4038.83 4880,-4040.41 4780,-4040.41 4776.17,-4038.83 4774.59,-4035 4774.59,-3982.5 4776.17,-3978.67 4780,-3977.09 4875,-3977.09
  pour cut-out: 6243.83,-3573.67 6246.33,-3576.17 6247.91,-3580 6247.91,-3637.5 6246.33,-3641.33 6242.5,-3642.91 6162.5,-3642.91 6158.67,-3641.33 6157.09,-3637.5 6157.09,-3577.5 6158.67,-3573.67 6162.5,-3572.09 6240,-3572.09
  pour cut-out: 5178.83,-3868.67 5180.41,-3872.5 5180.41,-3972.5 5178.83,-3976.33 5175,-3977.91 5087.5,-3977.91 5083.67,-3976.33 5082.09,-3972.5 5082.09,-3872.5 5083.67,-3868.67 5087.5,-3867.09 5175,-3867.09
  pour cut-out: 5441.33,-3218.67 5442.91,-3222.5 5442.91,-3335 5441.33,-3338.83 5428.83,-3351.33 5427.71,-3351.79 5425,-3352.91 5375,-3352.91 5371.17,-3351.33 5369.59,-3347.5 5369.59,-3222.5 5371.17,-3218.67 5375,-3217.09 5437.5,-3217.09
  pour cut-out: 4866.33,-3631.17 4867.91,-3635 4867.91,-3747.5 4866.33,-3751.33 4862.5,-3752.91 4787.5,-3752.91 4783.67,-3751.33 4782.09,-3747.5 4782.09,-3635 4783.67,-3631.17 4787.5,-3629.59 4862.5,-3629.59
  pour cut-out: 5391.33,-3068.67 5392.91,-3072.5 5392.91,-3147.5 5391.33,-3151.33 5387.5,-3152.91 5287.5,-3152.91 5283.67,-3151.33 5282.09,-3147.5 5282.09,-3072.5 5283.67,-3068.67 5287.5,-3067.09 5387.5,-3067.09
  pour cut-out: 5191.33,-3056.17 5192.91,-3060 5192.91,-3122.5 5191.33,-3126.33 5187.5,-3127.91 4875,-3127.91 4871.17,-3126.33 4869.59,-3122.5 4869.59,-3060 4871.17,-3056.17 4875,-3054.59 5187.5,-3054.59
  pour cut-out: 4678.83,-3118.67 4680.41,-3122.5 4680.41,-3197.5 4678.83,-3201.33 4675,-3202.91 4562.5,-3202.91 4558.67,-3201.33 4557.09,-3197.5 4557.09,-3122.5 4558.67,-3118.67 4562.5,-3117.09 4675,-3117.09
  text "SOLDER SIDE" at 6700.05,-4819.35 h75 r90
  text "00-60163 REV.B" at 6867.55,-4902.68 h75 r90
  text "BLUE SLEUTH PRO LiPo" at 6517.55,-5069.35 h75 r90